# Altium PCB PCB-Thermostat.PcbDoc (part 4 of 5)
Units mm, origin at the board's own origin, x right, y up, seen from the top; angles counter-clockwise.
Board outline 100 x 90 mm, 4 copper layers (Top, PWR, GND, Bottom), stack 1.585 mm thick; 187 components, 164 nets, 696 pads, 417 vias.
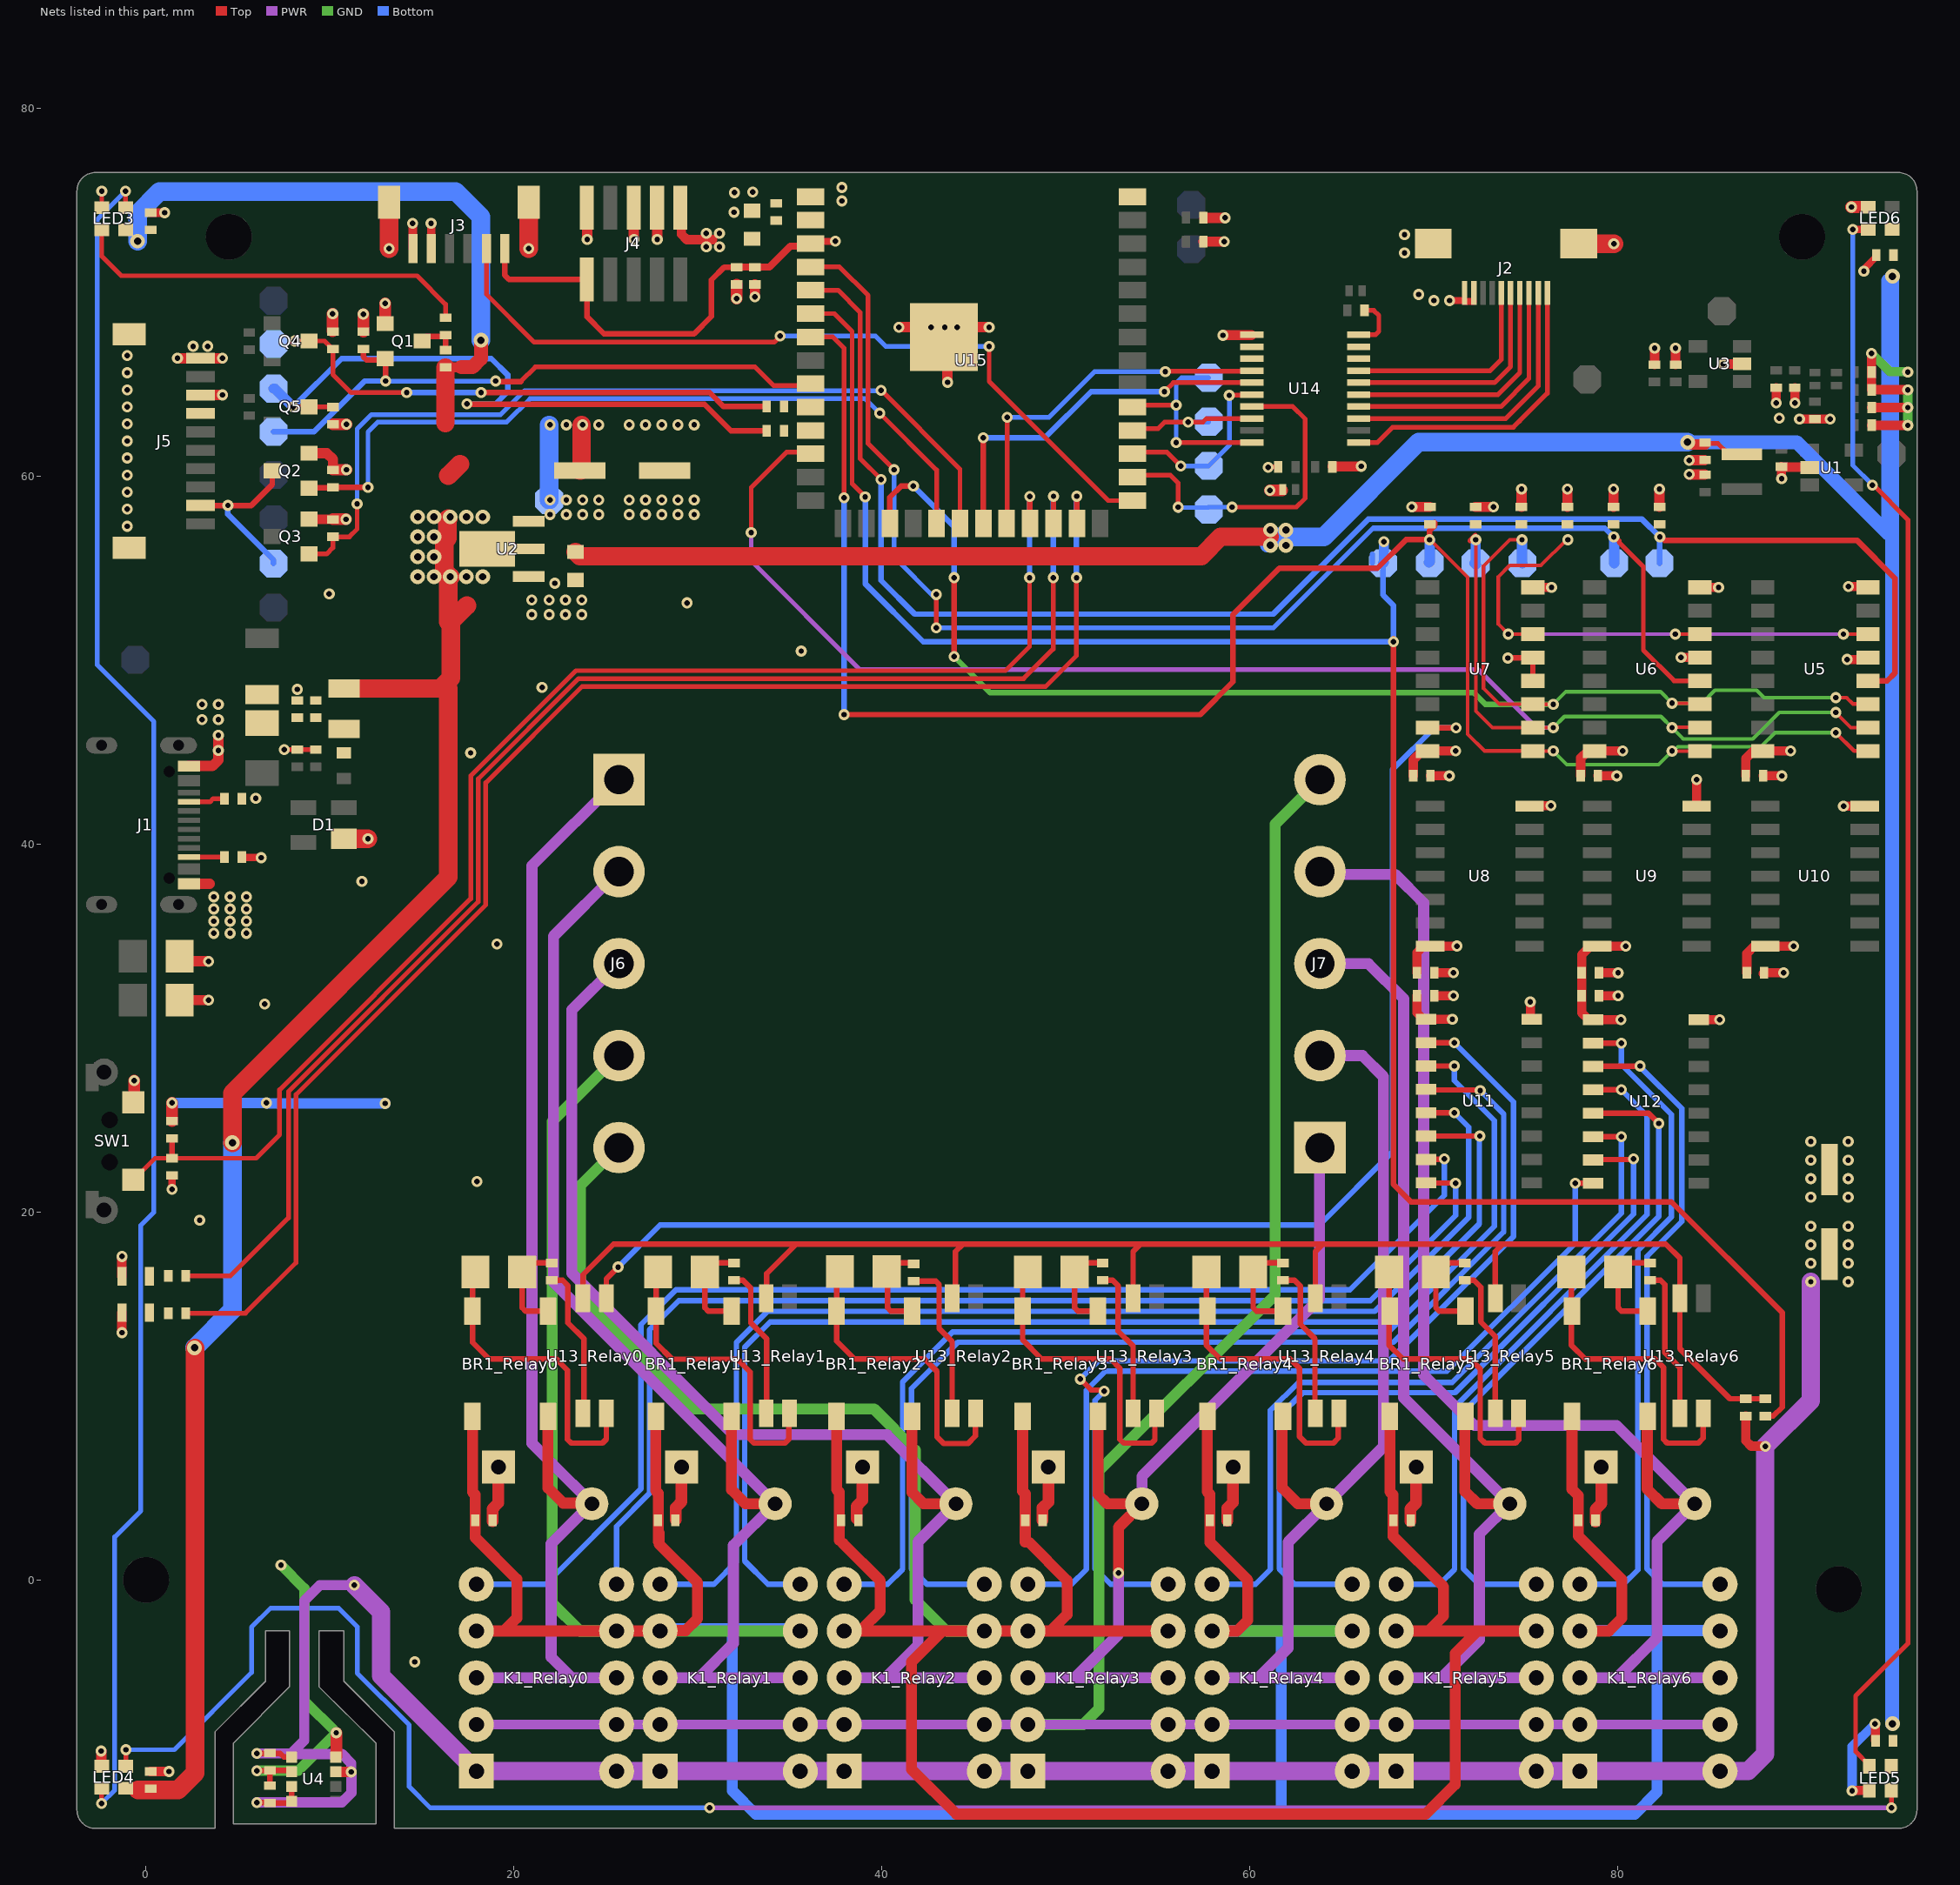
[diagram p4: the nets of this part, all layers, seen from the top]

## Via types
v1: diameter 0.6, hole 0.3, Top to Bottom, 391 vias
v2: diameter 0.8, hole 0.4, Top to Bottom, 26 vias

## Nets (pads, with @x,y where several pads share a name; then routed paths per layer and width w, separated by ;. In a path a pad name is that pad's centre, name@x,y a point inside that pad or via, vN(x,y) a via of type N, cw(c..) or ccw(c..) an arc to the next point about the centre after c; other vN are vias at no path point) (continued)
+3V3: C17.1 C18.1 C21.1 C22.1 C23.1 C24.1 C25.1 C26.1 C27.1 C28.1 C29.1 C30.1 C34.1 C35.1 FB6.2 J3.1 J4.1 K1_Relay0.1 K1_Relay0.10 K1_Relay1.1 K1_Relay1.10 K1_Relay2.1 K1_Relay2.10 K1_Relay3.1 K1_Relay3.10 K1_Relay4.1 K1_Relay4.10 K1_Relay5.1 K1_Relay5.10 K1_Relay6.1 K1_Relay6.10 P4.1 Q1.1 R4.2 R5.2 R6.2 R7.2 R8.2 R9.2 R10.2 R15.2 R16.2 R17.2 R20.2 R24.2 R29.1 R31.1 U2.3 U4.2 U4.5 U4.6 U4.8 U5.16 U6.16 U7.16 U8.14 U9.14 U10.14 U11.9 U12.9 U15.2 | length 196
  Top w0.2: v1(6.02,-12.09) v1@6.032,-12.103 ; v1@6.02,-9.449 v1@6.041,-9.427 ; C21.1@6.71,-9.427 C21.1@6.731,-9.406 ; C22.1@6.718,-12.103 C22.1@6.731,-12.116
  Top w0.254: R31.1@9.995,62.801 R31.1@10.008,62.814 ; R29.1@10.287,67.958 R29.1@10.293,67.964 ; FB6.2@61.745,59.233 FB6.2@61.781,59.269
  Top w0.3: v1@6.032,-12.103 C22.1@6.718,-12.103 ; v1@6.041,-9.427 C21.1@6.71,-9.427 ; C22.1@6.731,-12.116 7.823,-12.116 U4.5@7.919,-12.02 U4.6@7.919,-11.22 ; C21.1@6.731,-9.406 6.751,-9.427 7.293,-9.427 7.487,-9.62 U4.8@7.919,-9.62 U4.8@7.816,-9.518
  Top w0.406: v1(1.422,21.234) R20.2@1.422,21.989 ; R24.2@11.811,67.856 R24.2@11.836,67.831
  Top w0.457: J3.1@14.505,72.368 v1@14.505,73.736
  Top w0.5: C23.1@68.874,43.709 68.874,44.579 69.359,45.064 U7.16@69.654,45.064 v1(71.175,45.064) ; C29.1@69.074,31.759 69.074,30.839 U11.9@69.459,30.454 ; C26.1@69.074,33.009 69.074,34.106 69.269,34.301 69.269,34.399 69.319,34.449 69.779,34.449 U8.14@69.819,34.409 ; U11.9@69.569,30.479 v1(71.004,30.479) ; U8.14@69.819,34.46 v1(71.254,34.46) ; C24.1@77.974,43.709 77.974,44.679 78.359,45.064 U6.16@78.731,45.064 v1(80.252,45.064) ; U12.9@78.409,30.454 78.024,30.839 C30.1@78.024,31.759 C27.1@78.024,33.009 78.024,33.979 78.494,34.449 U9.14@78.871,34.449 v1(80.414,34.449) ; U12.9@78.646,30.454 v1(80.167,30.454) ; C25.1@86.949,43.709 86.949,44.654 87.359,45.064 U5.16@87.866,45.064 v1(89.387,45.064) ; C28.1@87.004,33.009 87.004,34.059 87.394,34.449 U10.14@88.006,34.449 v1(89.549,34.449)
  Top w0.508: J4.1@29.046,74.873 29.097,74.822 29.097,73.152 29.395,72.854 30.803,72.854 ; R10.2@86.944,8.913 86.944,7.57 87.242,7.273 v1(88.006,7.273)
  Top w0.559: U4.2@10.566,-10.425 v1@11.161,-10.425 ; R16.2@57.468,72.746 v1(58.598,72.746) ; R17.2@57.518,74.041 v1(58.649,74.041) ; v1(68.798,58.327) R5.2@69.774,58.327 ; R6.2@72.256,58.327 v1(73.232,58.327) ; R7.2@74.756,58.327 v1(74.756,59.303) ; R4.2@77.256,58.327 v1(77.256,59.303) ; R9.2@79.756,58.327 v1(79.756,59.303) ; R8.2@82.256,58.327 v1(82.256,59.303)
  Top w0.635: R29.1@10.147,67.869 v1(10.147,68.821) ; R31.1@10.173,62.827 v1(10.895,62.827) ; R24.2@11.811,67.856 v1(11.811,68.809) ; Q1.1@13.005,68.296 v1(13.005,69.393) ; v1(32.106,69.647) R15.2@32.106,70.421 ; v1(61.087,59.233) FB6.2@61.745,59.233
  Top w1: C17.1@23.583,60.312 23.629,60.312 23.679,60.362 v1@23.679,62.789
  PWR w0.559: v1(6.02,-9.423) 7.899,-9.423 ; v1@6.031,-12.09 6.039,-12.083 10.65,-12.083 11.163,-11.57 v1(11.163,-10.427) 11.155,-10.419 11.155,-9.961 10.65,-9.457 7.874,-9.457 ; 7.874,-9.449 7.899,-9.423 ; v1(11.328,-0.279) 9.448,-0.279 8.6,-1.127 8.6,-8.723 7.899,-9.423
  PWR w1: v1(11.328,-0.279) 12.776,-1.727 12.776,-5.207 K1_Relay0.1@17.958,-10.389 K1_Relay0.10@25.578,-10.389 K1_Relay1.1@27.94,-10.389 K1_Relay1.10@35.56,-10.389 K1_Relay2.1@37.948,-10.389 K1_Relay2.10@45.568,-10.389 K1_Relay3.1@47.93,-10.389 K1_Relay3.10@55.55,-10.389 K1_Relay4.1@57.937,-10.389 K1_Relay4.10@65.557,-10.389 K1_Relay5.1@67.945,-10.389 K1_Relay5.10@75.565,-10.389 K1_Relay6.1@77.927,-10.389 K1_Relay6.10@85.547,-10.389 87.075,-10.389 88.006,-9.457 v1(88.006,7.273) 90.479,9.746 v1(90.479,16.212)
  Bottom w1: P4.1@21.914,58.699 v1@21.914,62.789
  other v1: 92.517,16.212 90.479,17.219 92.517,17.219 90.479,18.227 92.517,18.227 90.479,19.234 92.517,19.234 21.965,57.912 22.847,57.912 23.73,57.912 24.613,57.912 21.965,58.699 22.847,58.699 23.73,58.699 24.613,58.699 21.965,62.789 22.847,62.789 23.73,62.789 24.613,62.789 30.455,72.466 31.166,72.466 30.455,73.203 31.166,73.203 14.494,73.736
+5V: C1.2 C13.1 C38.1 C39.1 C40.1 C41.1 F1.2 L1.1 LED3.1 LED4.1 LED5.1 LED6.1 R25.1 U2.2 | length 290.6
  Top w0.254: C1.2@84.736,61.779 85.428,61.779 L1.1@85.961,61.246
  Top w0.559: v2(2.642,12.624) 2.653,12.624 v2@2.667,12.609 ; R25.1@16.281,65.913 17.12,65.913 17.136,65.929 ; v2@18.204,67.378 v2(18.212,67.386) ; v2@83.781,61.719 C1.2@84.736,61.719
  Top w0.762: 17.136,65.929 17.745,65.929 18.204,66.388 v2@18.204,67.378
  Top w1: 16.281,62.89 R25.1@16.281,65.913 ; C13.1@23.343,55.88 23.571,55.651 57.353,55.651 58.403,56.701 v2@61.062,56.701
  Top w1.016: -0.418,-11.405 1.753,-11.405 2.667,-10.49 v2@2.667,12.609 ; v2(4.699,23.774) 4.699,26.467 16.434,38.202 16.434,48.459 ; F1.2@10.756,48.459 15.994,48.459 16.561,49.026 16.561,52.083 17.45,52.972 ; 16.434,52.083 v2@16.434,54.534 ; v2@16.434,57.683 16.383,57.633 16.383,56.617 16.205,56.617 16.205,54.864 v2(16.535,54.534) ; 16.434,60.022 17.069,60.657
  Bottom w0.762: v2@60.926,56.244 v2@60.935,56.244 ; v2(83.781,61.846) 89.712,61.846 94.691,56.866 94.691,70.627 94.92,70.856 v2(94.92,70.866) ; v2@94.894,-7.8 94.894,70.83 v2@94.913,70.848
  Bottom w1.016: v2(-0.457,72.771) -0.457,74.27 0.737,75.463 16.84,75.463 18.212,74.092 v2(18.212,67.386) ; v2(2.642,12.624) 4.699,14.681 v2(4.699,23.774) ; v2@61.062,56.701 64.016,56.701 69.161,61.846 v2(83.781,61.846)
  other v2: 94.92,-7.81 14.77,54.534 15.653,54.534 17.418,54.534 18.301,54.534 14.77,55.618 15.653,55.618 61.951,56.236 61.112,56.244 14.77,56.701 15.653,56.701 61.112,57.074 61.951,57.065 14.77,57.785 15.653,57.785 16.535,57.785 17.418,57.785 18.301,57.785
+BATT: J5.4
A1: J2.1 U14.1 | length 16.8
  Top w0.254: U14.1@65.903,61.834 66.929,61.834 67.754,62.658 74.317,62.658 74.651,62.992 76.164,64.505 J2.1@76.164,69.958
A2: J2.2 U14.3 | length 15.6
  Top w0.254: U14.3@65.903,63.134 73.903,63.134 75.664,64.894 J2.2@75.664,69.958
A3: J2.3 U14.4 | length 14.5
  Top w0.254: U14.4@65.903,63.784 73.639,63.784 75.164,65.309 J2.3@75.164,69.958
A4: J2.4 U14.5 | length 13.6
  Top w0.254: U14.5@65.903,64.434 73.476,64.434 74.664,65.622 J2.4@74.664,69.958
A5: J2.5 U14.6 | length 12.6
  Top w0.254: U14.6@65.903,65.084 73.288,65.084 74.164,65.96 J2.5@74.164,69.958
A6: J2.6 U14.7 | length 11.6
  Top w0.254: U14.7@65.903,65.734 73.049,65.734 73.664,66.349 J2.6@73.664,69.958
A7: U14.8
A8: U14.9
B: BR1_Relay3.4 J7.1 K1_Relay3.3 K1_Relay3.8 RV1_Relay3.2 | length 48.8
  Top w0.6: BR1_Relay3.4@51.743,8.903 51.743,4.645 52.241,4.147 RV1_Relay3.2@54.127,4.147 54.127,4.141 52.857,2.871 v1(52.857,0.381)
  PWR w0.6: K1_Relay3.3@47.93,-5.309 50.493,-5.309 ; v1(52.857,0.381) 52.857,-2.944 50.493,-5.309 ; RV1_Relay3.2@54.127,4.147 54.127,5.637 63.779,15.289 J7.1@63.779,23.503 ; K1_Relay3.8@55.55,-5.309 50.493,-5.309
B1: P16.1 U14.20 U15.31 | length 10.8
  Top w0.254: 54.407,63.856 v1(55.992,63.856) ; v1(55.992,61.834) U14.20@60.103,61.834
  Bottom w0.254: v1(55.992,61.834) 55.992,65.06 56.286,65.354 P16.1@57.76,65.354
B2: P15.1 U14.18 U15.30 | length 7.8
  Top w0.254: U15.30@53.619,62.586 55.016,62.586 55.372,62.941 v1(56.642,62.941) 57.443,62.941 57.628,63.126 60.096,63.126 U14.18@60.103,63.134
  Bottom w0.254: v1(56.642,62.941) 57.743,62.941 P15.1@57.76,62.958
B3: P13.1 U14.17 U15.28 | length 17.8
  Top w0.254: 54.407,60.046 55.677,60.046 56.101,59.622 v1(56.101,58.318) ; v1(59.03,58.318) 62.524,58.318 63.006,58.801 63.006,63.105 62.327,63.784 U14.17@60.103,63.784 ; U14.17@59.82,63.784 U14.17@59.823,63.781
  Bottom w0.254: v1@56.101,58.166 v1@56.126,58.141 ; v1@56.126,58.293 P13.1@57.76,58.293 ; P13.1@57.76,58.318 v1(59.03,58.318)
B4: P14.1 U14.16 U15.29 | length 9.2
  Top w0.254: 54.407,61.316 55.474,61.316 v1(56.236,60.554) ; v1@58.928,64.389 58.95,64.411 60.081,64.411 U14.16@60.103,64.434
  Bottom w0.254: v1(56.236,60.554) 57.751,60.554 P14.1@57.76,60.562 58.877,61.68 v1(58.877,64.389)
B5: U14.15 U15.21 | length 20.5
  Top w0.254: v1(55.351,64.596) 55.838,65.084 U14.15@60.103,65.084
  Top w0.305: U15.21@45.509,57.424 v1(45.509,62.085)
  Bottom w0.305: v1(45.509,62.085) 48.852,62.085 51.363,64.596 v1(55.351,64.596)
B6: U14.14 U15.22 | length 20.2
  Top w0.254: U15.22@46.779,57.424 46.783,57.428 46.812,57.457 v1(46.812,63.195) ; v1(55.397,65.684) 55.422,65.709 60.078,65.709 U14.14@60.103,65.734
  Top w0.305: U15.22@46.783,57.42 U15.22@46.783,57.428
  Top w0.381: U15.22@46.779,57.424 U15.22@46.779,57.526
  Bottom w0.254: v1(46.812,63.195) 49.073,63.195 51.562,65.684 v1(55.397,65.684)
B7: U14.13
B8: U14.12
BR1_Relay0: BR1_Relay0.1 C31_Relay0.2 R13_Relay0.2 | length 5.2
  Top w0.3: BR1_Relay0.1@21.847,14.623 20.623,14.623 20.447,14.799 C31_Relay0.2@20.447,16.739 20.942,17.234 R13_Relay0.2@22.047,17.234
BR1_Relay1: BR1_Relay1.1 C31_Relay1.2 R13_Relay1.2 | length 5.3
  Top w0.3: BR1_Relay1.1@31.822,14.623 30.55,14.623 30.374,14.799 30.374,16.739 30.869,17.234 R13_Relay1.2@31.974,17.234
BR1_Relay2: BR1_Relay2.1 C31_Relay2.2 R13_Relay2.2 | length 5
  Top w0.3: BR1_Relay2.1@41.633,14.623 40.477,14.623 40.301,14.799 40.301,16.739 40.797,17.234 R13_Relay2.2@41.732,17.234
BR1_Relay3: BR1_Relay3.1 C31_Relay3.2 R13_Relay3.2 | length 5.1
  Top w0.3: BR1_Relay3.1@51.743,14.623 50.646,14.623 50.47,14.799 C31_Relay3.2@50.47,16.739 50.965,17.234 R13_Relay3.2@52.07,17.234
BR1_Relay4: BR1_Relay4.1 C31_Relay4.2 R13_Relay4.2 | length 5.4
  Top w0.3: R13_Relay4.2@61.773,17.234 60.668,17.234 C31_Relay4.2@60.173,16.739 60.173,14.799 60.348,14.623 BR1_Relay4.1@61.794,14.623
BR1_Relay5: BR1_Relay5.1 C31_Relay5.2 R13_Relay5.2 | length 6.5
  Top w0.3: C31_Relay5.2@70.32,17.234 R13_Relay5.2@71.425,17.234 ; R13_Relay5.2@71.704,17.234 70.599,17.234 C31_Relay5.2@70.104,16.739 70.104,14.799 70.28,14.623 BR1_Relay5.1@71.707,14.623
BR1_Relay6: BR1_Relay6.1 C31_Relay6.2 R13_Relay6.2 | length 6.5
  Top w0.3: C31_Relay6.2@80.226,17.234 81.331,17.234 ; BR1_Relay6.1@81.606,14.623 80.186,14.623 80.01,14.799 C31_Relay6.2@80.01,16.739 80.505,17.234 R13_Relay6.2@81.61,17.234
BR2_Relay0: BR1_Relay0.2 C31_Relay0.1 U13_Relay0.2 | length 16.6
  Top w0.3: C31_Relay0.1@17.907,16.739 17.747,16.578 17.747,12.924 18.657,12.014 22.302,12.014 22.911,11.405 22.911,7.645 23.114,7.442 24.806,7.442 25.019,7.655 25.019,8.468 U13_Relay0.2@25.073,8.522
BR2_Relay1: BR1_Relay1.2 C31_Relay1.1 U13_Relay1.2 | length 16.4
  Top w0.3: C31_Relay1.1@27.838,16.739 27.722,16.622 27.722,12.876 28.589,12.009 32.145,12.009 32.838,11.316 32.838,7.645 33.041,7.442 34.733,7.442 34.946,7.655 U13_Relay1.2@34.946,8.468
BR2_Relay2: BR1_Relay2.2 C31_Relay2.1 U13_Relay2.2 | length 17.2
  Top w0.3: C31_Relay2.1@37.719,16.764 37.533,16.578 BR1_Relay2.2@37.533,14.623 37.533,12.991 38.511,12.014 42.317,12.014 42.989,11.342 42.989,7.786 43.353,7.422 44.684,7.422 45.088,7.826 U13_Relay2.2@45.088,9.068
BR2_Relay3: BR1_Relay3.2 C31_Relay3.1 U13_Relay3.2 | length 16.8
  Top w0.3: C31_Relay3.1@47.93,16.739 47.643,16.451 47.643,13.051 48.68,12.014 52.426,12.014 52.934,11.506 52.934,7.645 53.137,7.442 54.653,7.442 54.829,7.618 54.829,8.468 54.883,8.522 U13_Relay3.2@55.095,8.522
BR2_Relay4: BR1_Relay4.2 C31_Relay4.1 U13_Relay4.2 | length 16.4
  Top w0.3: C31_Relay4.1@57.633,16.739 57.633,12.764 58.383,12.014 62.18,12.014 62.687,11.506 62.687,7.798 63.043,7.442 64.531,7.442 64.798,7.709 U13_Relay4.2@64.798,8.522
BR2_Relay5: BR1_Relay5.2 C31_Relay5.1 U13_Relay5.2 | length 17
  Top w0.3: C31_Relay5.1@67.564,16.739 67.564,12.764 68.314,12.014 71.984,12.014 72.517,11.48 72.517,7.696 72.771,7.442 74.427,7.442 74.603,7.618 U13_Relay5.2@74.603,9.068
BR2_Relay6: BR1_Relay6.2 C31_Relay6.1 U13_Relay6.2 | length 16.6
  Top w0.3: C31_Relay6.1@77.47,16.739 77.47,12.764 78.22,12.014 82.017,12.014 82.474,11.557 82.474,7.645 82.677,7.442 84.369,7.442 84.636,7.709 U13_Relay6.2@84.636,8.522
C: J7.5 K1_Relay0.2 K1_Relay0.9 K1_Relay1.2 K1_Relay1.9 K1_Relay2.2 K1_Relay2.9 K1_Relay3.2 K1_Relay3.9 K1_Relay4.2 K1_Relay4.9 K1_Relay5.2 K1_Relay5.9 K1_Relay6.2 K1_Relay6.9 | length 127.5
  PWR w0.508: K1_Relay0.2@17.958,-7.849 K1_Relay0.9@25.578,-7.849 K1_Relay1.2@27.94,-7.849 K1_Relay1.9@35.56,-7.849 K1_Relay2.2@37.948,-7.849 K1_Relay2.9@45.568,-7.849 K1_Relay3.2@47.93,-7.849 K1_Relay3.9@55.55,-7.849 K1_Relay4.2@57.937,-7.849 K1_Relay4.9@65.557,-7.849 K1_Relay5.2@67.945,-7.849 K1_Relay5.9@75.565,-7.849 K1_Relay6.9@85.547,-7.849
  GND w0.5: K1_Relay3.2@47.742,-7.734 K1_Relay3.2@47.93,-7.734
  GND w0.6: K1_Relay3.2@47.93,-7.849 50.936,-7.849 51.791,-6.994 51.791,5.93 61.373,15.512 61.373,41.097 J7.5@63.779,43.503
E3: R4.1 U5.6 U6.6 U7.6 | length 30.2
  Top w0.2: U7.6@75.374,51.414 v1(74.041,51.414) 73.499,51.956 73.499,54.534 74.109,55.143 75.808,55.143 77.21,56.545 v1(77.274,56.545) ; v1(83.118,51.414) U6.6@84.451,51.414 ; v1(92.253,51.414) U5.6@93.586,51.414
  PWR w0.2: v1(74.041,51.414) v1(83.118,51.414) v1(92.253,51.414)
EN_ESP: C36.2 J3.6 J4.10 R15.1 U15.3 | length 25.2
  Top w0.305: J3.6@19.505,72.368 19.505,70.919 19.73,70.694 J4.10@23.966,70.694 23.966,68.668 24.892,67.742 29.794,67.742 30.734,68.682 30.734,70.663 31.432,71.361 R15.1@32.207,71.361
  Top w0.381: R15.1@32.207,71.361 33.223,71.361 33.884,71.361 35.021,72.499 35.872,72.499 36.132,72.758 37.452,72.758 v1(37.465,72.771)
ESP_RXD: P25.1 Q5.3 R19.2 R31.2 | length 36.9
  Top w0.254: v1(8.003,63.759) 8.854,63.759 Q5.3@8.865,63.769 R31.2@9.992,63.769
  Top w0.305: v1(17.448,63.928) 17.464,63.911 30.348,63.911 31.801,62.459 R19.2@33.731,62.459
  Bottom w0.305: v1(8.003,63.759) 10.64,66.396 18.771,66.396 19.66,65.507 19.66,64.592 18.979,63.911 17.464,63.911 v1(17.448,63.928)
  Bottom w0.559: P25.1@6.925,64.76 7.002,64.76 v1@7.995,63.767
ESP_TXD: P23.1 Q4.3 R18.2 R29.2 | length 28
  Top w0.254: v1(8.09,67.346) Q4.3@8.865,67.346 9.706,67.346 9.97,67.082 9.97,67.018 10.071,66.916 R29.2@10.16,66.916 10.16,65.532 11.151,64.541 v1(14.173,64.541)
  Top w0.305: v1@18.161,64.541 v1(18.212,64.541) 30.632,64.541 31.394,63.779 R18.2@33.731,63.779
  Bottom w0.305: v1(14.173,64.541) v1(18.212,64.541)
G: BR1_Relay1.4 J6.2 K1_Relay1.3 K1_Relay1.8 RV1_Relay1.2 | length 66.3
  Top w0.6: BR1_Relay1.4@31.822,8.903 31.822,4.907 32.582,4.147 RV1_Relay1.2@34.188,4.147
  PWR w0.6: J6.2@25.654,38.503 22.149,34.997 22.149,16.186 RV1_Relay1.2@34.188,4.147 31.928,1.886 31.928,-3.44 30.059,-5.309 ; K1_Relay1.3@27.94,-5.309 30.059,-5.309 ; K1_Relay1.8@35.56,-5.309 30.059,-5.309
GND: C1.1 C2.2 C3.1 C4.2 C5.2 C6.1 C7.2 C8.2 C9.2 C10.2 C11.2 C12.2 C13.2 C14.2 C15.2 C16.1 C17.2 C18.2 C19.2 C20.1 C21.2 C22.2 C23.2 C24.2 C25.2 C26.2 C27.2 C28.2 C29.2 C30.2 C32.1 C33.2 C34.2 C35.2 C36.1 C37.2 C38.2 C39.2 C40.2 C41.2 D1.1 J1.A1/B12 J1.B1/A12 J2.9 J2.10 J2.MP1 J2.MP2 J3.2 J3.MP1 J3.MP2 J4.3 J4.5 J4.9 J5.1 J5.3 J5.MP1 J5.MP2 LED1.2 LED2.2 LED3.3 LED4.3 LED5.3 LED6.3 Q2.2 Q3.2 R1.1 R2.1 R3.1 R23.2 R27.2 SW1.2 U1.2 U2.1 U3.2 U4.1 U4.7 U5.5 U5.8 U6.5 U6.8 U7.4 U7.5 U7.8 U8.7 U9.7 U10.7 U11.8 U12.8 U14.11 U15.1 U15.40 U15.41 | length 137.4
  Top w0.2: U5.5@93.48,50.038 U5.5@93.586,50.144 ; U5.8@93.54,54 U5.8@93.586,53.954
  Top w0.254: LED3.3@-2.403,74.59 v1(-2.403,75.489) ; v1(7.511,45.144) C11.2@8.23,45.144 C9.2@9.23,45.144 ; U14.11@60.103,67.684 U14.11@60.119,67.7 ; v1(60.985,60.477) 61.003,60.495 61.516,60.495 C33.2@61.533,60.512 ; C32.1@64.476,60.512 C32.1@64.48,60.508
  Top w0.3: v1(6.02,-10.363) 6.028,-10.355 6.722,-10.355 C21.2@6.731,-10.346 ; C22.2@6.731,-11.176 C21.2@6.731,-10.346 ; U4.7@7.919,-10.42 7.844,-10.346 C21.2@6.731,-10.346 ; v1(74.016,50.114) 74.03,50.129 75.105,50.129 75.119,50.144 U7.5@75.374,50.144 U7.4@75.374,48.874 ; U9.7@83.729,42.069 84.102,42.069 U9.7@84.252,42.219 ; v1@92.177,42.012 v1@92.205,42.04 ; U10.7@92.729,42.069 92.781,42.069 92.787,42.063 U10.7@92.787,42.035 ; U10.7@92.781,42.04 U10.7@92.787,42.035 ; U10.7@92.787,42.012 U10.7@92.787,42.035
  Top w0.381: v1(70.841,69.545) 71.623,69.545 71.664,69.505 71.664,69.498 J2.9@72.123,69.498 ; v1(93.366,71.145) 93.408,71.187 93.408,71.294 94.033,71.92 C41.2@94.033,72.009
  Top w0.406: R3.1@5.207,39.294 5.223,39.278 6.24,39.278 v1(6.256,39.262)
  Top w0.457: C38.2@0.256,74.322 0.479,74.322 0.989,74.322 v1@1.016,74.295 ; J3.2@15.505,72.368 v1@15.505,73.736
  Top w0.5: C23.2@69.814,43.709 v1(70.834,43.709) ; C29.2@70.034,31.759 v1(71.054,31.759) ; C26.2@70.034,33.009 v1(71.054,33.009) ; U8.7@75.194,42.069 75.204,42.078 76.343,42.078 v1(76.352,42.088) ; v1(75.235,31.42) 75.254,31.401 75.254,30.529 75.354,30.429 U11.8@75.489,30.429 ; U7.8@75.374,53.954 v1(76.394,53.954) ; C24.2@78.914,43.709 v1(79.934,43.709) ; C30.2@78.984,31.759 v1(80.004,31.759) ; C27.2@78.986,33.005 80.001,33.005 v1(80.004,33.002) ; v1(83.431,50.144) U6.5@84.451,50.144 ; U9.7@84.271,42.069 v1(84.271,43.504) ; U12.8@84.396,30.454 v1(85.522,30.455) ; U6.8@84.451,53.954 v1(85.471,53.954) ; C25.2@87.889,43.709 v1(88.909,43.709) ; C28.2@87.905,32.97 C28.2@87.944,33.009 v1(89.004,33.009) ; v1@92.267,42.069 U10.7@92.729,42.069 ; v1(92.46,50.038) U5.5@93.48,50.038 ; v1(92.52,54) U5.8@93.54,54 ; v1@92.738,-11.443 LED5.3@93.636,-11.443 ; U10.7@92.781,42.069 U10.7@93.406,42.069 ; C40.2@93.983,-8.717 v1@93.983,-7.82
  Top w0.508: v1(-1.309,13.45) LED1.2@-1.309,14.529 ; LED2.2@-1.309,16.51 v1(-1.309,17.589) ; C39.2@0.256,-10.404 v1(1.255,-10.404) ; Q3.2@8.876,57.657 R27.2@10.149,57.657 ; C20.1@81.991,66.065 v1(81.991,66.954) ; C19.2@83.131,66.065 v1(83.131,66.954) ; v1(85.725,66.091) 85.731,66.097 86.738,66.097 U3.2@86.744,66.103 ; v1(88.601,63.973) C15.2@88.601,64.802 ; C2.2@88.875,60.515 C2.2@88.9,60.49 ; v1(88.9,59.871) 88.887,59.884 88.887,60.49 C2.2@88.9,60.49 ; v1(89.612,63.973) C16.1@89.612,64.802 ; v1(89.868,63.1) C7.2@90.697,63.1 ; U1.2@90.421,60.465 90.396,60.49 C2.2@88.9,60.49 ; C7.2@90.71,63.1 v1(91.539,63.1) ; v1(93.777,66.678) 93.783,66.672 93.783,64.7 C14.2@93.79,64.694 v1(95.753,64.694) ; C5.2@93.79,62.763 v1(95.753,62.763) ; C6.1@93.79,63.729 v1(95.753,63.729)
  Top w0.559: v1(-2.438,-9.296) -2.431,-9.304 -2.431,-10.091 LED4.3@-2.403,-10.119 ; v1@1.717,66.409 J5.1@2.961,66.409 v1@4.157,66.409 ; R1.1@1.829,31.521 v1(3.404,31.521) ; C4.2@1.829,34.417 C4.2@2.108,34.138 ; C4.2@2.108,33.63 v1(3.404,33.63) ; J1.B1/A12@2.34,37.846 3.455,37.846 ; J1.A1/B12@2.34,44.246 3.61,44.246 3.937,44.574 v1(3.937,45.085) v1@3.937,45.796 ; J5.3@2.961,64.409 2.967,64.414 2.97,64.412 v1@4.166,64.412 ; Q3.2@8.865,57.668 Q3.2@8.876,57.657 ; Q2.2@8.865,61.245 9.833,61.245 10.16,60.917 R23.2@10.16,60.338 ; 13.208,73.152 13.206,73.154 13.206,74.431 J3.MP1@13.208,74.433 ; v1(23.978,72.873) J4.9@23.978,74.582 ; v1(26.518,72.873) J4.5@26.518,74.582 ; J4.3@27.776,74.594 27.788,74.582 v1(27.788,72.873) ; v1(33.096,69.748) C36.1@33.096,70.421 ; v1(40.919,68.097) v1(42.672,68.097) ; v1(43.412,68.097) 43.561,67.949 v1@43.561,65.278 ; v1(44.094,68.097) v1(45.822,68.097) ; v1@58.551,67.667 U14.11@60.087,67.667 ; C32.1@64.496,60.525 v1@66.032,60.525 ; v1(83.871,60.096) C3.1@84.719,60.096 ; v1(83.874,60.864) 83.882,60.872 C1.1@84.698,60.872 ; v1(92.685,74.625) v1@92.689,74.62 ; LED6.3@93.605,74.62 LED6.3@93.609,74.616
  Top w0.635: SW1.2@-0.678,25.956 -0.635,26 v1(-0.635,27.153) ; C37.2@1.422,24.943 v1(1.422,25.933) ; R27.2@10.173,57.658 v1(10.878,57.658) ; R23.2@10.173,60.35 v1(10.895,60.35) ; U4.1@10.344,-9.595 v1(10.344,-8.3)
  Top w0.66: v1@92.689,74.62 LED6.3@93.605,74.62
  Top w1.016: D1.1@10.76,40.286 10.762,40.284 v1(12.065,40.284) ; v1@13.203,72.365 J3.MP1@13.203,74.083 ; v1(20.803,72.365) 20.803,74.083 20.853,74.133 J3.MP2@20.805,74.182 ; U15.41@44.084,67.738 U15.41@44.146,67.676 ; J2.MP1@77.864,72.638 v1(79.775,72.638)
  GND w0.508: v1(93.777,66.678) 94.779,65.677 95.736,65.677 v1(95.753,65.659) ; v1(95.753,62.763) v1(95.753,63.729) v1(95.753,64.694)
  GND w0.559: v1(6.02,-10.363) 8.281,-10.363 v1(10.344,-8.3) 8.611,-6.566 8.611,-0.457 v1(7.341,0.813)
  Bottom w0.5: v1(92.728,-11.462) 92.728,-9.045 v1(93.963,-7.81)
  Bottom w0.559: v1(1.422,25.933) v1(6.553,25.933) ; v1@6.579,25.908 v1(13.005,25.908)
  other v1: 14.605,-4.445 2.921,19.558 90.479,20.812 92.517,20.812 17.983,21.666 90.479,21.819 92.517,21.819 90.479,22.827 92.517,22.827 90.479,23.834 92.517,23.834 6.447,31.314 19.075,34.569 3.683,35.154 4.572,35.154 5.461,35.154 3.683,35.814 4.572,35.814 5.461,35.814 3.683,36.474 4.572,36.474 5.461,36.474 3.683,37.135 4.572,37.135 5.461,37.135 11.733,37.968 92.258,42.059 5.969,42.494 17.648,44.958 3.937,45.923 3.048,46.761 3.937,46.761 3.048,47.6 3.937,47.6 8.23,48.412 21.526,48.517 35.611,50.495 20.974,52.476 21.914,52.476 22.796,52.476 23.679,52.476 29.413,53.111 20.974,53.264 21.914,53.264 22.796,53.264 23.679,53.264 9.959,53.604 22.225,54.178 -1.016,57.277 26.264,57.912 27.146,57.912 28.029,57.912 28.912,57.912 29.794,57.912 -1.016,58.204 26.264,58.699 27.146,58.699 28.029,58.699 28.912,58.699 29.794,58.699 -1.016,59.131 -1.016,60.058 66.048,60.541 -1.016,60.985 -1.016,61.912 26.264,62.789 27.146,62.789 28.029,62.789 28.912,62.789 29.794,62.789 -1.016,62.84 88.773,63.144 -1.016,63.767 4.166,64.414 -1.016,64.694 43.561,65.1 -1.016,65.621 1.715,66.406 4.157,66.412 -1.016,66.548 2.567,67.059 3.356,67.059 58.535,67.651 70.002,69.545 69.164,69.875 68.402,72.136 13.208,72.365 68.402,73.127 15.494,73.736 1.016,74.32 31.953,74.346 37.821,74.955 31.979,75.413 32.969,75.438 37.821,75.692
GPIO4: P8.1 R9.1 U6.4 U15.4 | length 74.9
  Top w0.254: U15.4@36.119,71.374 37.694,71.374 39.243,69.825 39.243,61.773 v1(40.665,60.35) ; v1(42.951,51.76) v1(42.951,53.569) ; v1(79.774,56.693) 79.858,56.693 80.061,56.49 80.061,56.406 81.382,55.085 81.382,50.546 83.054,48.874 U6.4@84.451,48.874
  Bottom w0.254: v1(40.665,60.35) 40.665,55.601 v1@42.951,53.315 ; v1(42.951,51.76) 61.285,51.76 66.7,57.175
  Bottom w0.305: 66.7,57.175 79.291,57.175 v1(79.774,56.693)
  Bottom w0.559: P8.1@79.792,55.265 v1@79.792,56.663
GPIO5: P9.1 R8.1 U5.4 U15.5 | length 85.9
  Top w0.254: U15.5@36.119,70.104 37.617,70.104 38.811,68.91 38.811,60.96 v1(39.954,59.817)
  Top w0.305: v1(82.274,56.693) 82.375,56.794 82.375,56.675 82.536,56.515 92.989,56.515 95.047,54.458 95.047,49.291 94.63,48.874 U5.4@93.586,48.874
  Bottom w0.305: v1(39.954,59.817) 39.954,54.331 41.783,52.502 61.265,52.502 66.421,57.658 81.309,57.658 v1(82.274,56.693) ; P9.1@82.256,55.265 v1@82.256,56.693
GPIO6: P10.1 R11.2 U15.6 | length 113
  Top w0.254: U15.6@36.119,68.834 37.414,68.834 38.379,67.869 38.379,59.588 v1(39.091,58.877)
  Top w0.3: v1@67.804,50.876 v1@67.804,51.159 ; v1(67.804,51.003) 67.804,21.509 68.754,20.559 82.904,20.559 88.925,14.538 88.925,9.398 88.44,8.913 R11.2@88.006,8.913
  Bottom w0.3: P10.1@66.654,55.265 P10.1@66.654,55.759 ; v1@67.804,50.876 67.804,52.973
  Bottom w0.305: v1(39.091,58.877) 39.091,54.153 42.24,51.003 v1(67.804,51.003) ; P10.1@67.234,55.265 67.234,53.543 67.804,52.973
  Bottom w0.559: P10.1@67.234,55.265 67.277,55.308 67.277,56.429 v1(67.285,56.437)
GPIO7: P5.1 R5.1 U5.1 U6.1 U7.1 U15.7 | length 99.1
  Top w0.2: v1(69.766,56.545) 69.794,56.545 71.832,54.507 71.832,45.981 72.749,45.064 U7.1@75.374,45.064 ; U7.1@75.379,45.06 v1(76.486,45.06) ; v1(82.936,45.059) 84.446,45.059 U6.1@84.451,45.064 ; v1(91.836,46.059) 92.831,45.064 U5.1@93.586,45.064
  Top w0.254: U15.7@36.119,67.564 37.338,67.564 37.948,66.954 37.948,58.877 v1@37.998,58.826
  Top w0.305: v1(37.948,47.041) 57.302,47.041 59.08,48.819 59.08,52.476 61.595,54.991 66.929,54.991 68.483,56.545 v1(69.766,56.545) ; v1@69.695,56.487 69.695,56.617 v1(69.766,56.545) ; R5.1@70.053,57.48 70.053,57.328 69.766,57.041 v1(69.766,56.545)
  GND w0.2: v1(76.486,45.06) 77.222,44.323 82.2,44.323 v1(82.936,45.059) 83.024,45.059 83.253,45.288 87.766,45.288 88.536,46.059 v1(91.836,46.059)
  Bottom w0.305: v1@37.948,46.939 v1(37.948,47.041) v1(37.948,58.826)
  Bottom w0.559: P5.1@69.732,55.299 69.77,55.337 69.77,56.541 v1(69.766,56.545)
GPIO8: P6.1 R6.1 U5.2 U6.2 U7.2 U15.12 | length 91.6
  Top w0.2: v1(72.274,56.545) 72.274,47.233 73.173,46.334 U7.2@75.374,46.334 ; U7.2@75.379,46.33 v1(76.486,46.33) ; v1@82.936,46.359 84.426,46.359 U6.2@84.451,46.334 ; v1(91.836,47.159) 92.661,46.334 U5.2@93.586,46.334
  Top w0.254: v1(32.893,56.934) 32.893,59.385 34.823,61.316 U15.12@36.119,61.316 ; 71.951,56.472 71.951,56.49 v1@72.14,56.679 ; v1@72.256,56.794 v1@72.14,56.679 ; v1(72.274,56.545) v1@72.14,56.679
  PWR w0.254: v1(32.893,56.934) 32.893,55.397 38.812,49.479 65.481,49.479 72.416,49.479 75.565,46.33 v1(76.486,46.33)
  GND w0.2: v1(76.486,46.33) 77.087,46.931 82.335,46.931 v1(82.936,46.33) 83.546,45.72 87.325,45.72 88.764,47.159 v1(91.836,47.159)
  Bottom w0.559: P6.1@72.274,55.203 72.212,55.265 72.268,55.321 72.268,56.54 v1(72.274,56.545)
GPIO9: P7.1 R7.1 U5.3 U6.3 U7.3 U15.17 | length 81.3
  Top w0.2: v1(74.782,56.545) 74.122,56.545 72.695,55.118 72.695,48.463 73.554,47.604 U7.3@75.374,47.604 U7.3@75.379,47.6 ; v1(82.936,47.659) 84.396,47.659 U6.3@84.451,47.604 ; v1(91.836,47.959) 92.427,47.959 92.768,47.617 93.573,47.617 U5.3@93.586,47.604
  Top w0.203: U7.3@75.379,47.6 v1(76.486,47.6)
  Top w0.305: U15.17@40.429,57.424 40.429,58.844 41.046,59.461 v1(41.707,59.461) ; v1(43.917,50.19) v1(43.917,54.483)
  GND w0.2: v1@76.498,47.6 v1(76.486,47.6) 77.172,48.285 82.31,48.285 v1(82.936,47.659) 84.565,47.659 85.265,48.359 87.536,48.359 87.936,47.959 v1(91.836,47.959)
  GND w0.305: v1(43.917,50.19) 45.872,48.235 72.161,48.235 72.796,47.6 v1(76.486,47.6)
  Bottom w0.305: v1(41.707,59.461) 43.917,57.252 v1(43.917,54.483)
  Bottom w0.559: v1(74.782,56.545) 74.79,56.537 74.79,55.278 P7.1@74.803,55.265
GPIO11: Q2.1 R23.1 U15.19 | length 42.4
  Top w0.254: v1(39.878,63.424) 42.969,60.332 U15.19@42.969,57.424
  Top w0.305: Q2.1@8.865,59.345 8.891,59.371 10.133,59.371 R23.1@10.16,59.398 v1(12.066,59.398)
  Bottom w0.254: v1(12.066,59.398) 12.066,62.407 12.6,62.942 19.609,62.942 20.879,64.211 39.091,64.211 v1(39.878,63.424)
GPIO12: Q3.1 R27.1 U15.20 | length 47.3
  Top w0.254: Q3.1@8.865,55.768 9.82,55.768 10.16,56.109 R27.1@10.16,56.706 11.057,56.706 11.474,57.123 v1(11.474,58.487) ; v1(39.954,64.668) 44.239,60.383 U15.20@44.239,57.424
  Bottom w0.254: v1(11.474,58.487) 11.474,62.564 12.259,63.348 19.279,63.348 20.574,64.643 39.929,64.643 v1(39.954,64.668)
GPIO16: P17.1 Q1.2 R24.1 U15.9 | length 34.1
  Top w0.254: 20.366,65.146 21.158,65.938 33.096,65.938 34.112,64.922 36.018,64.922 U15.9@36.119,65.024
  Top w0.305: R24.1@11.811,66.916 11.811,66.498 11.99,66.319 12.929,66.319 Q1.2@13.005,66.396 13.03,66.37 v1(13.03,65.172) ; v1@18.999,65.146 20.366,65.146
  Bottom w0.254: v1@13.03,65.156 18.983,65.156 v1(18.999,65.172)
  Bottom w0.305: P17.1@6.934,62.408 9.119,62.408 11.882,65.172 v1(13.03,65.172)
GPIO21: C37.1 R20.1 SW1.1 U15.23 | length 76.8
  Top w0.254: SW1.1@-0.678,21.756 0.494,22.929 R20.1@1.422,22.929 5.987,22.929 7.264,24.206 7.264,26.645 17.653,37.033 17.653,43.713 23.368,49.428 46.711,49.428 48.023,50.74 v1(48.023,54.483)
  Top w0.305: R20.1@1.422,22.929 C37.1@1.422,24.003 ; v1(48.039,58.9) 48.039,57.515 48.039,57.414 U15.23@48.049,57.424
  Top w0.559: U15.23@48.039,57.515 U15.23@48.049,57.526
  Bottom w0.254: v1@48.023,58.883 v1(48.039,58.9)
  Bottom w0.305: v1(48.023,54.483) v1@48.023,58.883
GPIO47: R22.2 U15.24 | length 79
  Top w0.254: R22.2@2.159,16.535 4.597,16.535 7.747,19.685 7.747,26.552 18.059,36.865 18.059,43.545 23.511,48.997 47.701,48.997 49.306,50.602 v1(49.306,54.483)
  Top w0.305: U15.24@49.319,57.424 49.323,57.42 49.323,57.522 v1(49.323,58.906)
  Top w0.559: U15.24@49.319,57.526 U15.24@49.323,57.522
  Bottom w0.305: v1(49.306,54.483) v1@49.306,58.89
GPIO48: R21.2 U15.25 | length 82.6
  Top w0.254: R21.2@2.159,14.503 5.41,14.503 8.153,17.247 8.153,26.384 18.466,36.697 18.466,43.332 23.698,48.565 48.895,48.565 50.573,50.243 v1(50.573,54.483)
  Top w0.305: U15.25@50.589,57.424 v1(50.589,58.91)
  Bottom w0.305: v1(50.573,54.483) v1@50.573,58.893
IO0: J3.5 U15.27 | length 43.2
  Top w0.254: J3.5@18.505,72.191 18.505,69.887 21.107,67.285 34.138,67.285 v1(34.468,67.615) ; v1@45.822,66.827 45.822,65.151 52.299,58.674 U15.27@53.619,58.674
  Bottom w0.254: v1(34.468,67.615) 39.649,67.615 40.208,67.056 v1(45.822,67.056)
NetC8_1: C8.1 F1.1 FB1.2
NetC10_1: C10.1 F2.1 FB2.2
NetJ1_A5: J1.A5 R2.2 | length 2.1
  Top w0.254: J1.A5@2.34,42.296 3.485,42.296 3.658,42.469 4.115,42.469 R2.2@4.267,42.316
NetJ1_B5: J1.B5 R3.2 | length 1.9
  Top w0.254: J1.B5@2.34,39.296 2.341,39.295 4.266,39.295 R3.2@4.267,39.294
NetLED1_1: LED1.1 R21.1
NetLED2_1: LED2.1 R22.1
NetLED3_2: LED3.2 LED4.4 | length 92.4
  Top w0.254: v1(-2.413,-12.141) -2.413,-11.329 LED4.4@-2.403,-11.319 ; v1(-1.118,75.489) -1.118,74.605 LED3.2@-1.103,74.59
  Bottom w0.254: v1(-2.413,-12.141) -1.697,-11.425 -1.697,2.342 -0.279,3.759 -0.279,19.279 0.432,19.99 0.432,42.443 0.432,46.66 -2.642,49.733 -2.642,73.965 v1(-1.118,75.489)
NetLED3_4: LED3.4 R26.1 | length 21.9
  Top w0.254: LED3.4@-2.403,73.39 -2.403,71.948 -1.346,70.891 14.732,70.891 16.281,69.342 R26.1@16.281,68.605
NetLED4_2: LED4.2 LED5.4 | length 110.4
  Top w0.254: LED4.2@-1.103,-10.119 -1.092,-10.108 v1(-1.092,-9.22) ; v1(94.859,-12.379) LED5.4@94.859,-11.42
  PWR w0.254: v1(30.632,-12.379) v1(94.859,-12.379)
  Bottom w0.254: v1(-1.092,-9.22) 1.548,-9.22 5.74,-5.028 5.74,-2.565 6.782,-1.524 10.465,-1.524 11.481,-2.54 11.481,-5.055 14.305,-7.879 14.305,-11.232 15.453,-12.379 v1(30.632,-12.379)
NetLED5_2: LED5.2 LED6.4 | length 87.1
  Top w0.254: v1(92.761,73.406) v1@92.766,73.411 ; LED6.4@93.605,73.411 LED6.4@93.609,73.416 ; LED5.2@93.659,-10.12 93.659,-10.07 92.913,-9.323 92.913,-6.299 95.758,-3.454 95.758,57.633 93.878,59.512 v1(93.832,59.512)
  Top w0.406: v1@92.766,73.411 LED6.4@93.605,73.411
  Bottom w0.254: v1(92.761,73.406) 92.761,60.584 v1(93.832,59.512)
NetQ1_3: Q1.3 R25.2 R26.2 | length 2.2
  Top w0.305: Q1.3@15.005,67.346 15.249,67.589 16.205,67.589 R26.2@16.281,67.666 R25.2@16.281,66.853
NetR12_Relay0_1: R12_Relay0.1 RV1_Relay0.1 | length 3.1
  Top w0.635: R12_Relay0.1@18.834,3.2 18.834,3.873 19.152,4.191 RV1_Relay0.1@19.152,6.182
NetR12_Relay1_1: R12_Relay1.1 RV1_Relay1.1 | length 3
  Top w0.635: R12_Relay1.1@28.791,3.267 28.791,3.94 29.108,4.258 RV1_Relay1.1@29.108,6.147
NetR12_Relay2_1: R12_Relay2.1 RV1_Relay2.1 | length 2.9
  Top w0.635: R12_Relay2.1@38.621,3.343 38.621,4.016 38.938,4.334 RV1_Relay2.1@38.938,6.147
NetR12_Relay3_1: R12_Relay3.1 RV1_Relay3.1 | length 3
  Top w0.635: R12_Relay3.1@48.73,3.251 48.73,3.924 49.047,4.242 RV1_Relay3.1@49.047,6.147
NetR12_Relay4_1: R12_Relay4.1 RV1_Relay4.1 | length 3.1
  Top w0.635: R12_Relay4.1@58.763,3.226 58.763,3.899 59.08,4.216 RV1_Relay4.1@59.08,6.207
NetR12_Relay5_1: R12_Relay5.1 RV1_Relay5.1 | length 3.1
  Top w0.635: R12_Relay5.1@68.72,3.2 68.72,3.873 69.037,4.191 RV1_Relay5.1@69.037,6.182
NetR12_Relay6_1: R12_Relay6.1 RV1_Relay6.1 | length 3.1
  Top w0.635: R12_Relay6.1@78.778,3.166 78.778,3.839 79.096,4.156 RV1_Relay6.1@79.096,6.147
NetR13_Relay0_1: R13_Relay0.1 U13_Relay0.1 | length 8.8
  Top w0.3: R13_Relay0.1@22.047,16.294 22.644,16.294 22.936,16.002 22.936,13.984 23.803,13.118 U13_Relay0.1@23.803,8.522
NetR13_Relay1_1: R13_Relay1.1 U13_Relay1.1 | length 8.8
  Top w0.3: R13_Relay1.1@31.953,16.294 32.444,16.294 32.868,15.871 32.868,13.98 33.73,13.118 U13_Relay1.1@33.73,8.522
NetR13_Relay2_1: R13_Relay2.1 U13_Relay2.1 | length 8.7
  Top w0.3: R13_Relay2.1@41.732,16.243 42.928,16.243 43.104,16.068 43.104,13.671 43.818,12.957 U13_Relay2.1@43.818,9.068
NetR13_Relay3_1: R13_Relay3.1 U13_Relay3.1 | length 8.7
  Top w0.3: R13_Relay3.1@52.07,16.294 52.54,16.294 52.832,16.002 52.832,13.538 53.648,12.723 U13_Relay3.1@53.648,8.522
NetR13_Relay4_1: R13_Relay4.1 U13_Relay4.1 | length 8.9
  Top w0.3: R13_Relay4.1@61.773,16.294 62.421,16.294 62.738,15.977 62.738,13.908 63.528,13.118 U13_Relay4.1@63.528,8.522
NetR13_Relay5_1: R13_Relay5.1 U13_Relay5.1 | length 8.7
  Top w0.3: R13_Relay5.1@71.704,16.294 72.174,16.294 72.542,15.926 72.542,14.035 73.333,13.245 U13_Relay5.1@73.333,8.522
NetR13_Relay6_1: R13_Relay6.1 U13_Relay6.1 | length 8.9
  Top w0.3: R13_Relay6.1@81.61,16.294 81.616,16.289 82.314,16.289 82.55,16.053 82.55,12.359 83.366,11.544 U13_Relay6.1@83.366,8.522
NetR14_1: R14.1 U14.10 | length 2.9
  Top w0.254: U14.10@65.903,67.684 66.82,67.684 67.005,67.869 67.005,68.732 66.732,69.006 R14.1@66.226,69.006
NetR18_1: R18.1 U15.10
NetR19_1: R19.1 U15.11
O: BR1_Relay4.4 J7.2 K1_Relay4.3 K1_Relay4.8 RV1_Relay4.2 | length 53.3
  Top w0.6: BR1_Relay4.4@61.75,8.522 61.75,5.001 62.604,4.147 RV1_Relay4.2@64.16,4.147
  PWR w0.6: K1_Relay4.3@57.937,-5.309 60.463,-5.309 ; J7.2@63.779,28.503 66.112,28.503 67.256,27.359 67.256,7.243 RV1_Relay4.2@64.16,4.147 62.078,2.064 62.078,-3.694 60.463,-5.309 ; K1_Relay4.8@65.557,-5.309 60.463,-5.309
PWRKEY: J5.9 P20.1 Q2.3 | length 9.3
  Top w0.305: J5.9@2.961,58.409 5.729,58.409 6.865,59.544 Q2.3@6.865,60.295
  Bottom w0.305: v1(4.451,58.409) 4.451,57.929 6.934,55.446 P20.1@6.934,55.245
RC: BR1_Relay0.3 BR1_Relay1.3 BR1_Relay4.3 BR1_Relay6.3 J6.4 K1_Relay0.4 K1_Relay0.7 K1_Relay1.4 K1_Relay1.7 K1_Relay4.4 K1_Relay4.7 K1_Relay6.4 K1_Relay6.7 R12_Relay0.2 R12_Relay1.2 R12_Relay4.2 R12_Relay6.2 | length 219.2
  Top w0.6: BR1_Relay0.3@17.747,8.903 17.747,4.783 17.894,4.636 17.894,2.314 20.157,0.051 20.157,-2.062 19.45,-2.769 ; K1_Relay0.4@17.958,-2.769 19.45,-2.769 ; BR1_Relay1.3@27.704,8.97 27.704,4.85 27.851,4.702 27.851,2.086 ; 27.872,2.565 27.89,2.548 27.89,1.955 29.972,-0.127 29.972,-2.099 29.329,-2.741 27.967,-2.741 K1_Relay1.4@27.94,-2.769 K1_Relay0.7@25.578,-2.769 19.45,-2.769 ; K1_Relay4.4@57.669,-2.654 57.678,-2.645 K1_Relay4.4@57.937,-2.645 ; BR1_Relay4.3@57.676,8.928 57.676,4.808 57.823,4.661 57.823,2.045 59.883,-0.015 59.883,-2.177 59.291,-2.769 K1_Relay4.4@57.937,-2.769 ; BR1_Relay6.3@77.506,8.903 77.506,4.933 77.838,4.601 R12_Relay6.2@77.838,3.251 77.838,2.4 80.215,0.023 80.215,-2.063 79.51,-2.769 K1_Relay6.4@77.927,-2.769
  GND w0.6: K1_Relay0.7@25.578,-2.769 23.597,-2.769 22.073,-1.245 22.073,24.921 J6.4@25.654,28.503 ; K1_Relay1.4@27.94,-2.769 K1_Relay1.7@35.56,-2.769 ; K1_Relay4.4@57.937,-2.769 K1_Relay4.7@65.557,-2.769
  Bottom w0.6: K1_Relay1.4@27.888,-2.654 31.867,-2.654 ; K1_Relay1.7@35.508,-2.654 31.867,-2.654 ; K1_Relay4.4@57.937,-2.769 61.697,-2.769 ; K1_Relay4.7@65.557,-2.769 61.697,-2.769 ; K1_Relay6.4@77.951,-2.745 82.118,-2.745 ; K1_Relay6.7@85.523,-2.745 82.118,-2.745 ; 31.867,-2.654 31.867,-11.446 33.157,-12.736 61.407,-12.736 ; 61.407,-12.736 80.907,-12.736 82.118,-11.525 82.118,-2.745 ; 61.407,-12.736 61.697,-12.446 61.697,-2.769
RELAY_IN_Relay2: BR1_Relay2.3 BR1_Relay3.3 BR1_Relay5.3 J6.5 K1_Relay2.4 K1_Relay2.7 K1_Relay3.4 K1_Relay3.7 K1_Relay5.4 K1_Relay5.7 R12_Relay2.2 R12_Relay3.2 R12_Relay5.2 | length 155.7
  Top w0.6: BR1_Relay2.3@37.533,9.046 BR1_Relay2.3@37.533,8.903 37.533,4.926 37.681,4.779 37.681,2.162 ; 37.882,1.988 39.903,-0.034 39.903,-1.676 38.926,-2.654 ; K1_Relay2.4@37.948,-2.769 43.282,-2.769 ; BR1_Relay3.3@47.643,8.954 BR1_Relay3.3@47.643,8.903 47.643,4.834 47.79,4.686 R12_Relay3.2@47.79,3.251 47.79,2.07 ; 47.968,2.07 50.063,-0.025 50.063,-1.867 49.162,-2.769 ; K1_Relay3.7@55.55,-2.769 49.162,-2.769 ; BR1_Relay5.3@67.607,8.903 67.607,4.808 67.78,4.636 67.78,2.375 70.522,-0.367 70.522,-1.943 69.696,-2.769 ; K1_Relay5.4@67.945,-2.769 69.696,-2.769 ; K1_Relay5.7@75.565,-2.769 72.375,-2.769 ; 43.282,-2.769 41.606,-4.445 41.606,-10.287 44.044,-12.725 69.545,-12.725 71.15,-11.12 71.15,-3.993 72.375,-2.769 ; 43.282,-2.769 K1_Relay2.7@45.568,-2.769 K1_Relay3.4@47.93,-2.769 49.162,-2.769 ; 69.696,-2.769 72.375,-2.769
  GND w0.6: J6.5@25.654,23.503 23.622,21.471 23.622,15.443 29.769,9.296 39.573,9.296 41.808,7.061 41.808,-1.067 43.51,-2.769 K1_Relay2.7@45.568,-2.769
RELAY_O0: BR1_Relay0.4 J6.1 K1_Relay0.3 K1_Relay0.8 RV1_Relay0.2 | length 68.4
  Top w0.6: BR1_Relay0.4@21.847,8.903 21.847,5.007 22.672,4.182 RV1_Relay0.2@24.232,4.182
  PWR w0.6: K1_Relay0.3@17.958,-5.309 K1_Relay0.8@25.578,-5.309 25.552,-5.283 K1_Relay0.8@26.114,-5.283 ; 23.114,-5.283 22.022,-4.191 22.022,1.972 RV1_Relay0.2@24.232,4.182 ; RV1_Relay0.2@24.354,4.059 24.249,4.164 RV1_Relay0.2@24.232,4.182 ; J6.1@25.654,43.503 20.98,38.829 20.98,7.433 22.073,6.341 RV1_Relay0.2@24.232,4.182
RELAY_O2: BR1_Relay2.4 J6.3 K1_Relay2.3 K1_Relay2.8 RV1_Relay2.2 | length 69.4
  Top w0.6: BR1_Relay2.4@41.633,8.903 41.633,4.772 42.259,4.147 RV1_Relay2.2@44.018,4.147
  PWR w0.6: J6.3@25.654,33.503 23.139,30.988 23.139,16.688 31.928,7.899 40.266,7.899 RV1_Relay2.2@44.018,4.147 41.961,2.089 41.961,-3.554 40.207,-5.309 ; K1_Relay2.3@37.948,-5.309 40.207,-5.309 ; K1_Relay2.8@45.568,-5.309 40.207,-5.309
RELAY_O5: BR1_Relay5.4 J7.3 K1_Relay5.3 K1_Relay5.8 RV1_Relay5.2 | length 60.2
  Top w0.6: BR1_Relay5.4@71.682,8.522 71.682,4.823 72.358,4.147 RV1_Relay5.2@74.117,4.147
  PWR w0.6: J7.3@63.779,33.503 66.446,33.503 68.351,31.598 68.351,9.913 RV1_Relay5.2@74.117,4.147 72.466,2.496 72.466,-3.256 70.413,-5.309 ; K1_Relay5.3@67.945,-5.309 70.413,-5.309 ; K1_Relay5.8@75.565,-5.309 70.413,-5.309
RELAY_O6: BR1_Relay6.4 J7.4 K1_Relay6.3 K1_Relay6.8 RV1_Relay6.2 | length 75.4
  Top w0.6: BR1_Relay6.4@81.588,8.522 81.588,4.945 82.385,4.147 RV1_Relay6.2@84.176,4.147
  PWR w0.6: J7.4@63.779,38.503 63.928,38.354 67.894,38.354 69.444,36.805 69.444,11.151 72.201,8.394 79.929,8.394 RV1_Relay6.2@84.176,4.147 82.118,2.089 82.118,-3.14 79.949,-5.309 ; K1_Relay6.3@77.524,-5.194 K1_Relay6.3@77.927,-5.194 ; K1_Relay6.3@77.927,-5.309 79.949,-5.309 ; K1_Relay6.8@85.547,-5.309 79.949,-5.309
RELAY_RESET_Relay0: K1_Relay0.6 U11.16 | length 64.3
  Top w0.3: U11.16@69.57,21.59 69.583,21.577 71.158,21.577 v1(71.171,21.565)
  Bottom w0.3: K1_Relay0.6@25.578,-0.229 25.578,2.921 27.381,4.724 27.381,13.614 28.956,15.189 65.811,15.189 66.548,15.189 71.171,19.812 v1(71.171,21.565)
RELAY_RESET_Relay1: K1_Relay1.6 U11.14 | length 65.5
  Top w0.3: U11.14@69.57,24.13 v1@72.466,24.13
  Bottom w0.3: K1_Relay1.6@35.56,-0.229 33.807,-0.229 32.542,1.037 32.542,12.648 33.914,14.021 67.132,14.021 72.466,19.355 v1@72.466,24.13
  other v1: 72.492,24.13
RELAY_RESET_Relay2: K1_Relay2.6 U11.12 | length 61
  Top w0.3: U11.12@69.569,26.669 69.6,26.638 72.486,26.638 v1(72.517,26.608)
  Bottom w0.3: K1_Relay2.6@45.568,-0.229 42.443,-0.229 41.605,0.61 41.605,10.414 44.12,12.929 67.793,12.929 73.787,18.923 73.787,25.338 v1(72.517,26.608)
RELAY_RESET_Relay3: K1_Relay3.6 U11.10 | length 55.9
  Top w0.3: v1(50.775,10.922) 51.366,10.331 52.024,10.331 v1(52.082,10.273) ; U11.10@69.569,29.209 v1(71.104,29.209)
  Bottom w0.3: v1(50.775,10.922) 51.765,11.913 67.564,11.913 74.327,18.675 74.327,25.987 v1(71.104,29.209) ; v1(52.082,10.273) 51.587,9.779 51.587,0.61 52.426,-0.229 K1_Relay3.6@55.55,-0.229
RELAY_RESET_Relay4: K1_Relay4.6 U12.15 | length 41.6
  Top w0.3: U12.15@78.646,22.834 78.672,22.86 80.822,22.86 v1(80.848,22.885)
  Bottom w0.3: K1_Relay4.6@65.557,-0.229 62.433,-0.229 61.595,0.61 61.595,8.913 62.868,10.185 71.145,10.185 80.848,19.888 v1(80.848,22.885)
RELAY_RESET_Relay5: K1_Relay5.6 U12.13 | length 36.7
  Top w0.3: U12.13@78.646,25.374 81.662,25.374 v1(82.22,24.816)
  Bottom w0.3: K1_Relay5.6@75.565,-0.229 72.441,-0.229 71.603,0.61 71.603,9.144 82.22,19.761 v1(82.22,24.816)
RELAY_RESET_Relay6: K1_Relay6.6 U12.11 | length 35.9
  Top w0.3: U12.11@78.646,27.914 78.659,27.927 81.191,27.927 v1(81.204,27.94)
  Bottom w0.3: v1(81.204,27.94) 81.204,27.889 83.464,25.629 83.464,19.482 81.585,17.602 81.585,0.61 82.423,-0.229 K1_Relay6.6@85.547,-0.229
RELAY_SET_Relay0: K1_Relay0.5 U11.15 | length 69.5
  Top w0.3: U11.15@69.569,22.859 69.583,22.872 70.548,22.872 v1(70.561,22.885)
  Bottom w0.3: K1_Relay0.5@17.958,-0.229 21.717,-0.229 26.907,4.961 26.907,13.877 28.804,15.773 65.43,15.773 70.561,20.904 v1@70.561,22.86
RELAY_SET_Relay1: K1_Relay1.5 U11.13 | length 66.7
  Top w0.3: U11.13@69.569,25.399 v1(71.104,25.399)
  Bottom w0.3: K1_Relay1.5@27.94,-0.229 30.864,-0.229 32.089,0.997 32.089,12.912 33.782,14.605 66.777,14.605 71.882,19.71 71.882,24.622 v1(71.104,25.399)
RELAY_SET_Relay2: K1_Relay2.5 U11.11 | length 60.5
  Top w0.3: U11.11@69.569,27.939 U11.11@69.855,27.939 ; U11.11@69.829,27.914 U11.11@69.855,27.939 ; v1(71.104,27.939) U11.11@69.855,27.939
  Bottom w0.3: K1_Relay2.5@37.948,-0.229 40.31,-0.229 41.123,0.584 41.123,10.773 43.837,13.487 67.539,13.487 73.279,19.228 73.279,24.968 71.104,27.143 v1(71.104,27.939)
RELAY_SET_Relay3: K1_Relay3.5 U12.16 | length 47.3
  Top w0.3: v1(77.673,21.565) U12.16@78.646,21.564
  Bottom w0.3: K1_Relay3.5@47.93,-0.229 50.292,-0.229 51.105,0.584 51.105,10.312 52.146,11.354 70.714,11.354 77.673,18.313 v1(77.673,21.565)
RELAY_SET_Relay4: K1_Relay4.5 U12.14 | length 41.5
  Top w0.3: U12.14@78.646,24.104 U12.14@78.779,24.104 ; U12.14@78.874,24.009 U12.14@78.779,24.104 ; v1(80.181,24.104) U12.14@78.779,24.104
  Bottom w0.3: K1_Relay4.5@57.937,-0.229 60.3,-0.229 61.112,0.584 61.112,9.22 62.636,10.744 70.993,10.744 80.181,19.932 v1(80.181,24.104)
RELAY_SET_Relay5: K1_Relay5.5 U12.12 | length 36
  Top w0.3: U12.12@78.646,26.644 v1(80.181,26.644)
  Bottom w0.3: K1_Relay5.5@67.945,-0.229 70.307,-0.229 71.12,0.584 71.12,9.398 81.585,19.863 81.585,25.24 v1(80.181,26.644)
RELAY_SET_Relay6: K1_Relay6.5 U12.10 | length 35.5
  Top w0.3: U12.10@78.646,29.184 v1(80.181,29.184)
  Bottom w0.3: K1_Relay6.5@77.927,-0.229 80.289,-0.229 81.077,0.559 81.077,17.907 82.906,19.736 82.906,25.298 80.181,28.023 v1(80.181,29.184)
RELAY_STS_Relay0: R10.1 R11.1 U13_Relay0.4 U13_Relay1.4 U13_Relay2.4 U13_Relay3.4 U13_Relay4.4 U13_Relay5.4 U13_Relay6.4 | length 91.4
  Top w0.3: U13_Relay0.4@23.749,15.318 23.749,16.606 25.407,18.264 35.334,18.264 ; U13_Relay0.4@23.803,14.772 U13_Relay0.4@23.803,15.318 ; U13_Relay1.4@33.73,15.318 33.73,16.659 35.334,18.264 ; U13_Relay2.4@43.996,14.772 43.996,15.318 43.996,17.852 44.407,18.264 ; U13_Relay3.4@53.648,14.772 U13_Relay3.4@53.648,15.318 53.648,17.852 54.059,18.264 ; U13_Relay4.4@63.554,14.772 U13_Relay4.4@63.554,15.318 63.554,17.852 63.965,18.264 ; U13_Relay5.4@73.333,14.772 U13_Relay5.4@73.333,15.318 73.333,17.852 73.744,18.264 ; R11.1@88.006,9.853 R10.1@86.944,9.853 86.083,9.853 83.366,12.57 U13_Relay6.4@83.366,15.318 83.366,17.498 82.6,18.264 73.744,18.264 ; 35.334,18.264 63.965,18.264 ; 63.965,18.264 73.744,18.264
RELAY_STSN_Relay0: U7.15 U13_Relay0.3 | length 73.4
  Top w0.3: U13_Relay0.3@25.019,15.318 25.019,16.376 v1(25.657,17.014) ; U7.15@69.654,46.334 U7.15@69.682,46.306 ; U7.15@69.668,46.32 v1(71.203,46.32)
  Bottom w0.3: v1(25.657,17.014) 27.94,19.297 63.772,19.297 67.755,23.28 67.755,44.059 70.016,46.32 v1(71.203,46.32)